# Altium PCB Piezo_Regulator_Head.PcbDoc (part 4 of 4)
Units mil, origin at the board's own origin, x right, y up, seen from the top; angles counter-clockwise.
Board outline 2047.24 x 1850.39 mil, 6 copper layers (Top Layer, GROUND, SIGNAL1, SIGNAL2, POWER, Bottom Layer), stack 60.866 mil thick; 136 components, 91 nets, 517 pads, 213 vias.
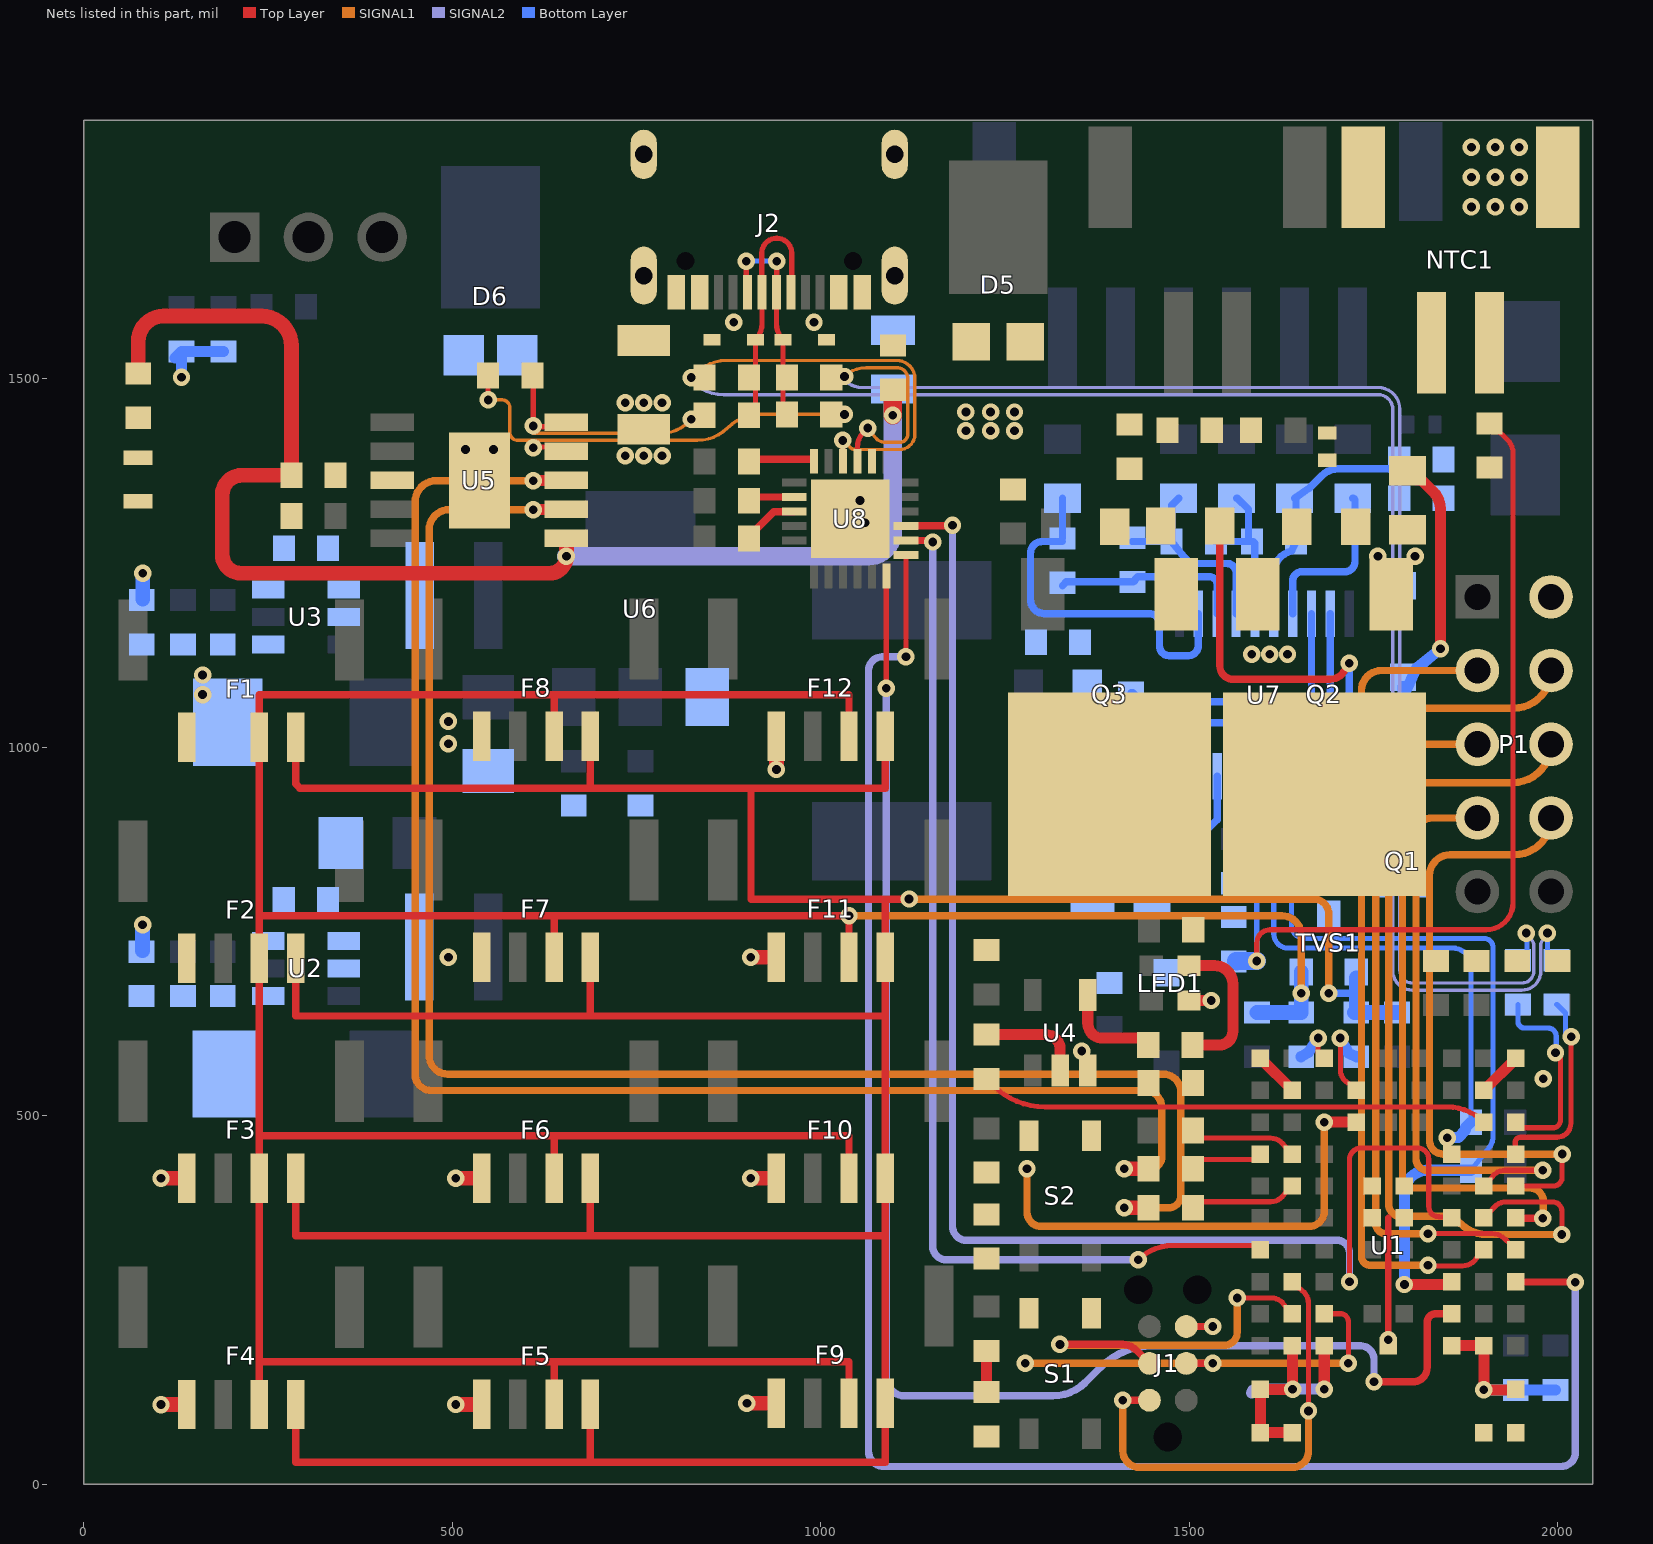
[diagram p6: the nets of this part, all layers, seen from the top]

## Via types
v1: diameter 23.62, hole 11.81, Top Layer to Bottom Layer, tented both sides, 213 vias

## Nets (pads, with @x,y where several pads share a name; then routed paths per layer and width w, separated by ;. In a path a pad name is that pad's centre, name@x,y a point inside that pad or via, vN(x,y) a via of type N, cw(c..) or ccw(c..) an arc to the next point about the centre after c; other vN are vias at no path point) (continued)
CFG2: R16.1 U5.2 | length 2223.3
  Top Layer w15: v1@610.12,1322.63 U5.2@655.11,1322.63
  Top Layer w20: v1(1412,375) R16.1@1445,375
  SIGNAL1 w10: v1(610.12,1322.28) 495.98,1322.28 ccw(c495.98,1295.1) 468.8,1295.1 468.8,581.55 ccw(c493.91,581.55) 493.91,556.45 1464.75,556.45 cw(c1464.75,532.49) 1488.71,532.49 1488.71,391.72 cw(c1471.99,391.72) 1471.99,375 v1(1412,375)
CFG3: R17.1 U5.3 | length 2197.5
  Top Layer w10: v1(610.12,1361.65) v1@610.12,1362
  Top Layer w15: v1@610.12,1362 U5.3@655.11,1362
  Top Layer w20: v1(1412,427.95) R17.1@1445,427.95
  SIGNAL1 w10: v1(610.12,1361.65) 478.81,1361.65 ccw(c478.81,1332.59) 449.75,1332.59 449.75,556.34 ccw(c471.91,556.34) 471.91,534.18 1439.85,534.18 cw(c1439.85,511.26) 1462.77,511.26 1462.77,443.87 cw(c1446.85,443.87) 1446.85,427.95 v1(1412,427.95)
CH_D_N: R9.2 R27.2 U5.5 | length 346.6
  Top Layer w7: R9.2@608.85,1504.44 cw(c608.85,1503.17) 610.12,1503.17 v1(610.12,1435.87) ; v1@610.12,1434.87 649.24,1434.87 ccw(c649.24,1440.74) U5.5@655.11,1440.74
  SIGNAL1 w4.61: v1@610.12,1434.87 610.12,1425.86 783.05,1425.86 ccw(c783.05,1480.19) 821.47,1441.77 v1(824.56,1444.87)
CH_D_P: R9.1 R29.2 U5.4 | length 629.4
  Top Layer w7: v1(548.88,1471.16) R9.1@548.85,1504.44 ; v1@610.12,1407.24 649.24,1407.24 cw(c649.24,1401.37) U5.4@655.11,1401.37
  SIGNAL1 w4.61: v1(548.88,1471.16) 567.83,1471.16 cw(c567.83,1460.65) 578.34,1460.65 578.34,1426.96 ccw(c589.05,1426.96) 589.05,1416.25 v1@610.12,1416.25 ; v1@610.12,1407.24 v1@610.12,1416.25 ; v1(1032.41,1451.49) 917.86,1451.49 ccw(c917.86,1389.2) 873.82,1433.25 cw(c832.79,1474.28) 832.79,1416.25 v1@610.12,1416.25
  other v1: 610.12,1406.24
CHG: Q1.2 U7.2 | length 219.8
  Bottom Layer w7: U7.2@1691.57,960.76 1691.57,821.61 ccw(c1705.16,821.61) 1705.16,808.01 Q1.2@1764.41,808.01
CTS_DEBUG: U1.J7 U8.18 | length 2010.3
  Top Layer w7: v1(1089,1080) 1089.11,1080.11 1089.11,1232.14 U8.18@1089.21,1232.24
  Top Layer w10: v1(1750.74,138.93) 1803.39,138.93 ccw(c1803.39,158.55) 1823,158.55 1823,219.61 cw(c1834.81,219.61) 1834.81,231.42 U1.J7@1856.54,231.42
  SIGNAL2 w10: v1(1089,1080) 1089.21,1079.79 1089.21,144.75 ccw(c1114.09,144.75) 1114.09,119.88 1315.26,119.88 ccw(c1315.26,181.74) 1359,138 1379.43,158.43 cw(c1450.14,87.72) 1450.14,187.72 1732.55,187.72 cw(c1732.55,169.52) 1750.74,169.52 v1(1750.74,138.93)
D_N: D7.2 J2.A7 J2.B7 R26.1 R27.1 | length 357.9
  Top Layer w7: R27.1@902.56,1450.46 R27.1@911.62,1450.46 ; R27.1@911.62,1440.46 D7.2@911.62,1553 ccw(c890.49,1574.13) 920.37,1574.13 J2.A7@920.37,1617.38 920.12,1637.5 920.12,1670.32 cw(c940.36,1670.32) 940.36,1690.56 940.43,1690.56 cw(c940.43,1670.25) 960.74,1670.32 960.74,1637.5 J2.B7@960.74,1617.38
D_P: D8.2 J2.A6 J2.B6 R28.1 R29.1 | length 300.2
  Top Layer w7: v1@899.43,1659.14 v1(898.98,1659.5) 898.98,1637.5 J2.B6@900.68,1617.38 ; v1(940.43,1659.5) 940.43,1637.5 J2.A6@940.06,1617.38 940.06,1574.35 ccw(c970.25,1574.35) D8.2@948.9,1553 948.9,1451.49 R29.1@954.41,1451.49
  Bottom Layer w7: v1(898.98,1659.5) 899.04,1659.56 v1@940.43,1659.56
DEBUG_UART: C40.2 R36.1 S2.3 U1.C4 | length 649.1
  Top Layer w15: v1(1683.31,491.26) U1.C4@1726.61,491.26
  SIGNAL1 w10: v1(1280,427.95) 1280,369.09 ccw(c1299.24,369.09) 1299.24,349.84 1662.79,349.84 ccw(c1662.79,370.35) 1683.31,370.35 v1(1683.31,491.26)
DSG: R46.1 U7.1 | length 538.4
  Top Layer w10: R46.1@1541.64,1300.17 1541.64,1110.2 ccw(c1559.67,1110.2) 1559.67,1092.17 1691.49,1092.17 ccw(c1691.49,1113.7) 1709.56,1101.98 v1(1717.16,1113.7)
  Bottom Layer w10: U7.1@1717.16,960.76 v1(1717.16,1113.7)
GND: C1.1 C2.1 C5.2 C6.1 C9.1 C10.1 C11.1 C12.1 C13.1 C14.1 C15.1 C17.1 C18.2 C19.1 C20.1 C21.1 C22.1 C23.1 C25.1 C26.1 C30.2 C31.1 C34.1 C35.1 C40.1 D2.2 D7.1 D8.1 F1.1 F2.1 F3.1 F4.1 F5.1 F6.1 F7.1 F8.1 F9.1 F10.1 F11.1 F12.1 J1.5 J2.A1/B12 J2.B1/A12 J2.S1 J2.S2 J2.S3 J2.S4 LED1.3 NT1.2 NTC1.2 NTC1.MP1 NTC1.MP2 P1.2 Q1.1 R7.2 R8.2 R14.1 R24.2 R30.1 R42.1 S1.1 S2.1 TVS1.3 U1.A1 U1.A9 U1.B2 U1.B8 U1.E4 U1.E5 U1.F4 U1.F5 U1.K2 U1.K3 U1.K5 U1.K7 U1.K8 U1.L1 U1.L9 U1.M1 U1.M2 U1.M8 U1.M9 U2.1 U3.1 U4.3 U5.11 U6.1 U7.3 U8.2 U8.25 | length 1445.2
  Top Layer w9: v1(1769.92,195.98) 1769.92,361.34
  Top Layer w10: J1.5@1496,214 v1(1532.02,214) ; U1.K2@1640,188.11 U1.K2@1640.26,187.85 ; U1.K5@1769.92,188.11 U1.K5@1769.92,194.92
  Top Layer w15: LED1.3@1499.59,656.38 v1(1529.87,656.38) ; U1.L1@1596.69,129.06 U1.L1@1596.69,128.79 ; U1.A1@1596.69,577.87 U1.B2@1640,534.57 ; U1.M2@1640,70 U1.M1@1596.69,70 U1.L1@1596.69,128.79 ; U1.K2@1640.26,187.85 1640.13,187.72 1640.13,128.92 v1(1640.26,128.79) U1.L1@1596.69,128.79 ; v1(1683.31,129.06) U1.K3@1683.31,188.11 ; U1.K7@1856.54,188.11 U1.K8@1899.84,188.11 v1(1899.84,128.11) 1942.2,128.11 ccw(c1942.2,129.06) U1.L9@1943.15,129.06 ; U1.B8@1899.84,534.57 U1.A9@1943.15,577.87
  Top Layer w20: v1(105,108.11) F4.1@140,108.11 ; v1(105,415) F3.1@140,415 ; v1(505,108.19) 539.72,108.19 F5.1@540,108.46 ; v1(505,415) F6.1@540,415 ; v1(900,110) F9.1@940,110 ; v1(905,415) F10.1@940,415 ; v1(905,715) F11.1@940,715 ; v1(940,969.75) F12.1@940,1015
  SIGNAL2 w15: 1584.88,123.64 cw(c1590.3,123.64) 1590.3,129.06 v1(1683.31,129.06)
  Bottom Layer w10: R8.2@78.66,722.48 R8.2@80,723.82 ; R7.2@78.85,1199.48 R7.2@80.19,1200.82
  Bottom Layer w15: R14.1@124.05,1528.24 R14.1@132.81,1537 ; v1(132.81,1502) R14.1@132.81,1537 ; C11.1@189.81,1537 R14.1@132.81,1537 ; v1(1899.84,128.11) R30.1@1996.95,128.11
  Bottom Layer w20: R8.2@80,723.82 v1(80,759) ; R7.2@80.19,1200.82 v1(80.19,1236)
  other v1: 1980.55,550 1354.21,587.68 495,715 495,1004.59 495,1035 161.39,1071.38 161.39,1097.94 1060.5,1304.33 1053.35,1334.84 518,1404 556,1404 882.21,1576.63 990.95,1576.63 1882.96,1733.04 1915.37,1733.04 1947.78,1733.04 1882.96,1773.45 1915.37,1773.45 1947.78,1773.45 1882.96,1813.86 1915.37,1813.86 1947.78,1813.86
LED_DO: R22.1 U1.C8 | length 691.8
  Top Layer w7: R22.1@1225,550 1233.71,541.29 ccw(c1304.42,612) 1304.42,512 1530.13,512 1538.5,512 1849.81,512 cw(c1849.77,441.19) U1.C8@1899.84,491.26
NetC3_1: C3.1 U3.6
NetC3_2: C3.2 L2.1 U3.2
NetC4_1: C4.1 U2.6
NetC4_2: C4.2 L1.1 U2.2
NetC7_1: C7.1 R4.1 R8.1 U2.4
NetC8_1: C8.1 R6.1 R7.1 U3.4
NetC15_2: C15.2 U7.8 | length 98.4
  Bottom Layer w10: C15.2@1510.02,875.41 1512.52,875.41 1522.52,885.41 1522.52,886.31 1538.02,901.81 U7.8@1538.02,960.76
NetC36_1: C36.1 C37.2
NetC38_1: C38.1 C39.2
NetD2_1: D2.1 R10.1
NetD3_2: D3.2 R33.1 R34.1
NetD4_1: D4.1 R44.1 R45.2 | length 372
  Top Layer w15: R45.2@1796.36,1375.02 1808.86,1362.52 1815.27,1362.52 1831.37,1346.42 cw(c1808.59,1323.64) 1840.81,1323.64 1840.81,1133.72 v1(1841,1133.53)
  Bottom Layer w15: 1790,1058.41 1790,1067.68 ; D4.1@1790,1082.53 1790,1067.68 ; v1(1841,1133.53) 1807.5,1106.2 1790,1067.68
NetD4_2: D4.2 Q2.1 R45.1 R48.2
  other v1: 1756.06,1259.2 1806.47,1259.2
NetD6_1: D6.1 D6.2 F13.2
  other v1: 735,1395.32 759.94,1395.32 784.87,1395.32 735,1467.32 759.94,1467.32 784.87,1467.32
NetF13_1: F13.1 J2.A4/B9 J2.B4/A9 R23.1
NetLED1_4: LED1.4 R20.2 R21.2 | length 203.5
  Top Layer w15: LED1.4@1499.59,703.62 1534.62,703.62 cw(c1534.62,678.99) 1559.24,678.99 1559.24,614.45 cw(c1540.8,614.45) 1540.8,596 R21.2@1504.48,596
NetQ1_3: Q1.3 R44.2
NetQ2_2: Q2.2 Q3.2
NetQ3_1: Q3.1 R46.2 R49.2
NetR5_2: R5.2 U1.D2 | length 147.7
  Top Layer w7: R5.2@1505,480.07 1515.49,469.58 1610.39,469.58 cw(c1610.39,447.95) 1626.91,461.92 1631.69,456.26 U1.D2@1640,447.95
NetR11_1: R11.1 U1.A3 | length 64.6
  Top Layer w7: v1@1675,604.35 1675,586.18 U1.A3@1683.31,577.87
  Bottom Layer w15: R11.1@1652,580 1662,585.94 v1@1674.55,605.26
  other v1: 1675,605.35
NetR12_1: R12.1 U1.B4 | length 114.2
  Top Layer w7: v1(1705.06,605.35) 1705.1,562.74 ccw(c1726.65,562.74) 1718.3,542.88 U1.B4@1726.61,534.57
  Bottom Layer w15: v1@1704.92,604.85 1715.54,585.84 1716.8,584.58 R12.1@1726.8,580
NetR16_2: R16.2 U1.E2 | length 140.8
  Top Layer w7: R16.2@1508.31,380.9 1510.62,383.2 1610.45,383.2 ccw(c1610.45,404.65) 1626.56,390.49 1631.69,396.33 U1.E2@1640,404.65
NetR17_2: R17.2 U1.D1 | length 100.7
  Top Layer w7: R17.2@1505,427.95 1505,429.27 1516.5,440.77 1589.51,440.77 U1.D1@1596.69,447.95
NetR20_1: R20.1 R21.1 U4.4 | length 136.8
  Top Layer w15: U4.4@1362.4,663.91 1362.4,625.74 ccw(c1382.93,625.74) 1382.93,605.21 1436.98,605.21 1444.48,597.71 R21.1@1444.48,596
NetR22_2: R22.2 U4.2 | length 140
  Top Layer w15: R22.2@1225,610 1305.21,610 cw(c1305.21,590.21) 1325,590.21 U4.2@1325,561.55
NetR25_1: R25.1 U5.8
NetR53_2: R53.2 U8.8 | length 64.6
  Top Layer w10: R53.2@902.56,1334.44 cw(c907.65,1334.44) 907.65,1339.53 U8.8@964.21,1339.53
NetR54_2: R54.2 U8.9 | length 78.3
  Top Layer w10: R54.2@902.56,1283.26 902.56,1285.76 936.13,1319.33 963.7,1319.33 U8.9@964.21,1319.84
NetR55_2: R55.2 U8.6 | length 90.5
  Top Layer w10: R55.2@902.56,1387.76 R55.2@904.46,1389.65 ; R55.2@904.46,1390.65 U8.6@990.28,1390.65 ; U8.6@990.28,1389.65 U8.6@990.79,1387.76
NetR57_1: R57.1 U1.D9 | length 278.1
  Top Layer w7: U1.D9@1943.15,447.95 cw(c1943.15,448.67) 1942.43,448.67 1942.43,463.82 cw(c1949.31,463.82) 1949.31,470.7 1999.02,470.7 ccw(c1999.02,489.5) 2017.83,489.5 v1@2017.83,605.69
  Bottom Layer w7: R57.1@1998.53,651 1999.25,651 2010.75,639.5 v1@2010.75,605.39 ; v1@2017.52,606 v1@2017.52,610.5
  other v1: 2018.52,607
NetR58_1: R58.1 U1.C9 | length 272.3
  Top Layer w7: U1.C9@1943.15,491.26 1951.46,483.58 1993.33,483.58 ccw(c1993.33,494.05) 2003.8,494.05 2003.8,580.66 v1@1997.99,586.47
  Bottom Layer w7: R58.1@1946,651 1946,628.06 ccw(c1955.17,628.06) 1955.17,618.89 1987.06,618.89 cw(c1987.06,607.97) 1997.99,607.97 v1@1997.99,586.47
  other v1: 1996.99,585.47
P0.05: P1.7 U1.E8 | length 806.7
  Top Layer w7: U1.E8@1899.84,404.65 1908.15,412.96 1911.59,417.51 cw(c1928.63,404.65) 1928.63,426 v1(1979.86,426) v1@1980.55,426
  SIGNAL1 w10: P1.7@1891,904 1829.12,904 ccw(c1829.12,882.69) 1807.81,882.69 1807.81,441.08 ccw(c1822.89,441.08) 1822.89,426 v1(1979.86,426)
P1.05: P1.8 U1.E9 | length 860.6
  Top Layer w7: U1.E9@1943.15,404.65 1994.23,404.65 ccw(c1994.23,416.41) 2006,416.41 v1(2006,447.95)
  SIGNAL1 w10: P1.8@1991,904 cw(c1941,904) 1941,854 1854.01,854 ccw(c1854.01,826.11) 1826.12,826.11 1826.12,466.38 ccw(c1844.55,466.38) 1844.55,447.95 v1(2006,447.95)
P1.12: P1.3 U1.G8 | length 1123.9
  Top Layer w7: v1@1823,298 1824.74,296.26 1870.89,296.26 ccw(c1870.89,318.83) 1891.53,309.72 U1.G8@1899.84,318.03
  SIGNAL1 w10: v1(1824,297) 1746.14,297 cw(c1746.14,309.4) 1733.74,309.4 1733.74,1076.74 cw(c1761,1076.74) 1761,1104 P1.3@1891,1104
P1.13: P1.4 U1.G9 | length 1165.8
  Top Layer w7: v1(1824,340) 1910.92,340 1910.99,340 cw(c1910.97,315.35) 1928.37,332.81 1934.84,326.34 U1.G9@1943.15,318.03
  SIGNAL1 w10: v1(1824,340) 1767.07,340 cw(c1767.07,354.17) 1752.9,354.17 1752.9,1037.69 cw(c1768.02,1037.69) 1768.02,1052.8 1939.8,1052.8 ccw(c1939.8,1104) P1.4@1991,1104
P1.14: P1.5 U1.F8 | length 1140.4
  Top Layer w7: U1.F8@1899.84,361.34 1908.15,369.65 1914.32,376.19 cw(c1930.09,361.34) 1930.09,383 1993.09,383 cw(c1993.09,370.43) 2005.65,370.43 v1(2005.65,338.9)
  SIGNAL1 w10: P1.5@1891,1004 1788.39,1004 ccw(c1788.39,986.45) 1770.84,986.45 1770.84,379.26 ccw(c1786.63,379.26) 1786.63,363.47 1844.52,363.47 cw(c1844.52,329.77) 1868.35,353.6 ccw(c1903.86,389.11) 1903.86,338.9 v1(2005.65,338.9)
P1.15: P1.6 U1.F9 | length 1028.7
  Top Layer w10: U1.F9@1943.64,360.85 v1(1979.86,360.85)
  SIGNAL1 w10: v1(1979.86,360.85) 1980.55,360.85 1980.55,383.71 ccw(c1962.27,383.71) 1962.27,401.99 1803.39,401.99 cw(c1803.39,415.87) 1789.51,415.87 1789.51,933.8 cw(c1807.7,933.8) 1807.7,952 1939,952 ccw(c1939,1004) P1.6@1991,1004
PACK_N: C36.2 C38.2 D5.1 D5.2 NT1.1 Q2.3 R48.1
  other v1: 1585,1126.13 1609.21,1126.13 1633.42,1126.13 1197.14,1429.41 1230.55,1429.41 1262.96,1429.41 1197.14,1454.82 1230.55,1454.82 1262.96,1454.82
R\E\S\E\T\: C2.2 J1.3 R3.1 S1.3 U1.J3 | length 625.8
  Top Layer w7: U1.J3@1683.31,231.42 1705,231.42 cw(c1705,220.42) 1716,220.42 v1(1716,164)
  Top Layer w10: J1.3@1496,164 v1(1532.02,164)
  Top Layer w15: C2.2@1225,125 R3.1@1225,181.02
  SIGNAL1 w10: v1(1277.68,164) v1(1532.02,164) v1(1716,164)
RTS_DEBUG: U1.H9 U8.19 | length 2552.3
  Top Layer w7: v1(1115.73,1122.69) 1115.73,1260.73 U8.19@1115.79,1260.79
  Top Layer w10: U1.H9@1943.15,274.72 1943.51,274.36 2023.64,274.36 v1(2024,274)
  SIGNAL2 w10: v1(1115.73,1122.69) 1083.69,1122.69 ccw(c1083.69,1104) 1065,1104 1065,45.02 ccw(c1086.02,45.02) 1086.02,24 2004.57,24 ccw(c2004.57,43.43) 2024,43.43 v1(2024,274)
RX_DEBUG: U1.F7 U8.21 | length 2008
  Top Layer w7: v1(1717.52,274.74) 1717.52,440.04 cw(c1733.74,440.04) 1733.74,456.26 1809.96,456.26 cw(c1809.96,441.19) 1825.04,441.19 1825.04,376.88 ccw(c1839.03,376.88) 1839.03,362.89 ; 1839.03,362.69 1855.18,362.69 U1.F7@1856.54,361.34
  Top Layer w10: U8.21@1115.89,1300.26 1178,1300.26 v1(1178.9,1301.16)
  SIGNAL2 w10: v1(1178.9,1301.16) 1178.9,349.82 ccw(c1197.72,349.82) 1197.72,331 1700.39,331 cw(c1700.39,313.88) 1717.52,313.88 v1(1717.52,274.74)
SCL: R31.1 U1.D7 U7.5 | length 759.1
  Top Layer w10: v1@1856.13,468.97 v1@1856.33,468.77 ; U1.D7@1856.33,448.16 U1.D7@1856.54,447.95
  Bottom Layer w7: U7.5@1614.8,960.76 1614.8,746.85 ccw(c1634.14,746.85) 1634.14,727.5 1857.59,727.5 cw(c1857.59,702.48) 1882.6,702.48 R31.1@1882.6,491.49
  Bottom Layer w15: v1@1854.11,468.97 1854.11,470.62 1865.17,470.62 1874.87,480.32 1874.87,483.76 R31.1@1882.37,491.26
  other v1: 1850.13,469.97
SDA: R32.1 U1.H7 U7.4 | length 1079.3
  Top Layer w15: v1(1792.08,271.04) 1852.85,271.04 U1.H7@1856.54,274.72
  Bottom Layer w7: U7.4@1638.94,932.92 1638.94,758.28 ccw(c1656.74,758.28) 1656.74,740.48 1900.22,740.48 cw(c1900.22,728.34) 1912.36,728.34 1912.36,472.99 cw(c1884.4,472.99) 1904.9,453.98 1903.78,452.77 R32.1@1882.37,426 ; U7.4@1640.39,960.76 U7.4@1643.19,957.96
  Bottom Layer w15: v1(1792.08,271.04) 1792.08,395.19 cw(c1822.89,395.19) 1822.89,426 R32.1@1882.37,426
SRN: C28.1 C31.2 R38.2 U7.19 | length 596.6
  Bottom Layer w10: C31.2@1352,950 1354.6,952.6 1354.6,1006.86 R38.2@1362,1014.27 C28.1@1421,1014.27 ; 1387.75,985.88 1398.93,987.28 1401.79,990.15 1420.71,1014.49 1420.71,1020.35 1433.5,1033.14 1675.15,1033.14 ccw(c1675.15,1049.56) 1691.57,1049.56 U7.19@1691.57,1181.24
SRP: C28.2 C30.1 R37.2 U7.18 | length 363
  Bottom Layer w10: C28.2@1421,1074.27 1423.5,1074.27 1436.31,1061.46 1649.63,1061.46 ccw(c1649.63,1077.8) 1665.98,1077.8 U7.18@1665.98,1181.24
SWCLK: J1.4 U1.J2 | length 512
  Top Layer w7: v1(1565.2,252.8) 1611.36,252.8 cw(c1611.36,231.42) 1628.77,243.82 1631.69,239.73 U1.J2@1640,231.42
  Top Layer w10: v1(1324.64,189.69) 1409.76,189.69 cw(c1409.76,164) 1427.97,182.12 J1.4@1446,164
  SIGNAL1 w10: v1(1324.64,189.69) 1325.79,188.53 1547.71,188.53 ccw(c1547.71,206.02) 1565.2,206.02 v1(1565.2,252.8)
SWDIO: J1.2 U1.H2 | length 620.4
  Top Layer w7: U1.H2@1640,274.72 1648.31,266.41 1652.92,263.05 cw(c1640,245.33) 1661.93,245.33 v1(1661.93,99.5)
  Top Layer w10: v1(1409.98,114) J1.2@1446,114
  SIGNAL1 w10: v1(1409.98,114) 1409.98,45.55 ccw(c1432.53,45.55) 1432.53,23 1640.26,23 ccw(c1640.26,44.66) 1651.59,26.2 ccw(c1640.26,44.66) 1658.73,33.34 ccw(c1640.26,44.66) 1661.93,44.66 v1(1661.93,99.5)
TS1: C25.2 NTC1.1 R42.2 U7.6 | length 1346.6
  Top Layer w7: v1(1591.59,709.91) 1591.59,734.04 cw(c1609.81,734.04) 1609.81,752.26 1902.6,752.26 ccw(c1902.6,789.13) 1939.47,789.13 1939.47,1398.77 ccw(c1913.37,1398.77) 1931.83,1417.23 1926.94,1422.11 1920.5,1427.76 C25.2@1907.37,1439.26
  Bottom Layer w7: U7.6@1589.2,960.76 1591.61,958.35 v1(1591.59,709.91)
  Bottom Layer w25: R42.2@1563.61,709.43 1564.1,709.91 v1(1591.59,709.91)
TWI0.SCL: F1.4 F2.4 F3.4 F4.4 F5.4 F6.4 F7.4 F8.4 F9.4 F10.4 F11.4 F12.4 R1.1 R12.2 TVS1.1 | length 5834
  Top Layer w10: F4.4@287.64,108.11 287.64,30 687.64,30 ; F3.4@287.64,415 287.64,336.89 687.64,336.89 ; F2.4@287.64,713.46 287.64,635.35 687.64,635.35 ; F1.4@287.64,1013.46 287.64,950.21 293.5,944.35 687.64,944.35 ; F5.4@687.64,108.46 687.64,30 ; F6.4@687.64,415 687.64,336.89 ; F7.4@687.64,713.82 687.64,635.35 ; F8.4@687.64,1013.82 687.64,944.35 ; F12.4@1087.64,1015 1087.64,944.35 905.53,944.35 ; v1(1120,794) 1119.59,793.59 1087.64,793.59 ; 687.64,30 1087.64,30 F9.4@1087.64,110 1087.64,336.89 ; 687.64,336.89 1087.64,336.89 ; 687.64,635.35 1087.64,635.35 ; 687.64,944.35 905.53,944.35 ; 905.53,944.35 905.53,793.59 1087.64,793.59 ; 1087.64,336.89 F10.4@1087.64,415 1087.64,635.35 ; 1087.64,635.35 F11.4@1087.64,715 1087.64,793.59
  SIGNAL1 w10: v1(1120,794) 1120.15,793.85 1668.93,793.85 cw(c1668.93,773.38) 1689.4,773.38 v1(1689.4,666.35)
  Bottom Layer w10: v1(1689.4,666.35) 1726.67,666.36
  Bottom Layer w20: R12.2@1724.3,640 R12.2@1726.8,640 R1.1@1782,640 ; R12.2@1726.67,640.14 1726.67,666.36 TVS1.1@1726.67,686.89
TWI0.SDA: F1.3 F2.3 F3.3 F4.3 F5.3 F6.3 F7.3 F8.3 F9.3 F10.3 F11.3 F12.3 R2.1 R11.2 TVS1.2 | length 5439.9
  Top Layer w10: F4.3@238.43,108.11 238.43,166.02 ; 238.43,472.91 638.43,472.91 ; 238.43,771.38 638.43,771.38 ; F5.3@638.43,108.46 638.43,166.02 ; F6.3@638.43,415.35 638.43,472.91 ; F7.3@638.43,713.82 638.43,771.38 ; F8.3@638.43,1013.82 638.43,1071.38 ; F9.3@1038.43,110 1038.43,166.02 638.43,166.02 ; F10.3@1038.43,416.89 1038.43,472.91 638.43,472.91 ; F11.3@1038.43,715.35 v1(1038.43,771.38) 638.43,771.38 ; F12.3@1038.43,1015.35 1038.43,1071.38 638.43,1071.38 ; 238.43,166.02 F3.3@238.43,415 F2.3@238.43,713.46 238.43,1071.38 638.43,1071.38 ; 238.43,166.02 638.43,166.02
  SIGNAL1 w10: v1(1038.43,771.38) 1625.56,771.38 cw(c1625.56,744.93) 1652,744.93 v1(1652,666.35)
  Bottom Layer w20: R2.1@1592,640 R11.2@1652,640 v1(1652,666.35) TVS1.2@1652,695
TX_DEBUG: U1.G1 U8.20 | length 1455.9
  Top Layer w7: v1(1431,304.55) cw(c1478.03,257.52) 1440.53,312.45 cw(c1478.03,257.52) 1478.03,324.03 1590.69,324.03 U1.G1@1596.69,318.03
  Top Layer w10: U8.20@1115.84,1280.42 1150.92,1280.42 v1@1151.96,1279.38
  SIGNAL2 w10: v1@1151.96,1279.38 1151.96,323.07 ccw(c1170.47,323.07) 1170.47,304.55 v1(1431,304.55)
  other v1: 1151.96,1278.38
USB_D_N: R26.2 R57.2 U8.4 | length 2614.2
  Top Layer w7: v1(824.56,1501.48) R26.2@842.56,1501.48 ; U8.4@1030.16,1387.76 v1(1030.16,1416.23)
  SIGNAL1 w4.61: v1(824.56,1501.48) 830.12,1507.03 cw(c872.56,1464.59) 872.56,1524.61 1103.33,1524.61 cw(c1103.33,1500.13) 1127.82,1500.13 1127.82,1427.37 1127.82,1424.49 cw(c1107.14,1424.56) 1107.2,1403.89 1104.33,1403.89 1047.81,1403.89 cw(c1047.81,1416.23) 1039.19,1407.4 v1(1030.16,1416.23)
  SIGNAL2 w4.61: v1@824.56,1496.48 ccw(c868.25,1540.16) 868.25,1478.38 1064,1478.38 1699.96,1478.38 1756.12,1478.38 1756.25,1478.38 cw(c1756.21,1458.32) 1776.27,1458.36 1776.27,1458.22 1776.27,696.59 ccw(c1802.47,696.59) 1802.47,670.39 1951.46,670.39 ccw(c1951.46,696) 1977.07,696 1977.07,731.81 cw(c1986.08,731.81) v1@1986.08,740.81
  Bottom Layer w7: v1(1986.08,747.81) 1986.08,723.46 ccw(c1998.53,723.46) R57.2@1998.53,711
USB_D_P: R28.2 R58.2 U8.3 | length 2139.1
  Top Layer w7: R28.2@1014.43,1501.48 1015.91,1502.96 v1(1032.43,1502.96) ; U8.3@1049.84,1387.76 1049.84,1400.99 1049.84,1406.43 cw(c1081.08,1406.38) 1060.51,1429.89 v1(1064.02,1432.96)
  SIGNAL1 w4.61: v1(1032.43,1502.96) cw(c1061.49,1473.89) 1061.49,1515 1103.33,1515 cw(c1103.33,1500.13) 1118.2,1500.13 1118.2,1427.37 1118.2,1424.51 cw(c1107.14,1424.56) 1107.18,1413.5 1104.38,1413.5 ; v1(1064.02,1432.96) 1073.38,1420.98 ccw(c1088.72,1432.96) 1088.72,1413.5 1104.33,1413.5
  SIGNAL2 w4.61: v1@1032.43,1497.96 ccw(c1056.48,1522.02) 1056.48,1487.99 1087.96,1487.99 1699.96,1487.99 1756.12,1487.99 cw(c1756.12,1478.38) 1756.18,1487.99 cw(c1756.21,1458.32) 1785.88,1458.42 1785.89,1458.28 cw(c1776.27,1458.22) 1785.89,1458.22 1785.89,696.59 ccw(c1802.47,696.59) 1802.47,680 1951.46,680 ccw(c1951.46,696) 1967.46,696 1967.46,731.81 ccw(c1958.46,731.81) v1@1958.46,740.81
  Bottom Layer w7: R58.2@1946,711 ccw(c1946,723.46) 1958.46,723.46 v1@1958.46,747.81
  other v1: 1957.46,747.81
VC0: C35.2 R47.2 U7.17 | length 231.6
  Bottom Layer w10: U7.17@1640.39,1181.24 1640.39,1225.55 cw(c1652.84,1225.55) 1652.84,1238 1711.09,1238 ccw(c1711.09,1251.91) 1725,1251.91 1725,1334.64 ccw(c1721.85,1334.64) R47.2@1721.85,1337.79
VC1: C33.1 C34.2 R43.2 U7.16 | length 323
  Bottom Layer w10: U7.16@1614.8,1181.24 1614.8,1236.4 cw(c1645,1236.4) 1633.56,1264.35 1639.06,1266.6 1639.2,1266.67 C33.1@1645,1279.17 1645,1335.9 R43.2@1643.11,1337.79 1663.11,1351.51 1680.04,1368.44 cw(c1702.36,1346.12) 1702.36,1377.69 C34.2@1782.18,1377.69
VC2: C32.1 C33.2 R41.2 U7.15 | length 215.1
  Bottom Layer w10: C32.1@1536.14,1279.17 C33.2@1580.46,1279.17 ; R41.2@1564.37,1337.76 1565.46,1337.76 1580.46,1322.76 C33.2@1580.46,1279.17 ; U7.15@1589.2,1181.24 1589.2,1274.96 ccw(c1585,1274.96) C33.2@1585,1279.17 C33.2@1580.46,1279.17
VC3: C32.2 R39.2 R56.1 U7.14 | length 278.7
  Bottom Layer w10: R56.1@1423,1279.17 C32.2@1476.14,1279.17 ; R39.2@1485.63,1337.73 1476.14,1328.24 C32.2@1476.14,1279.17 ; 1510.9,1249.28 cw(c1510.9,1272.09) 1492.98,1257.98 1486.14,1266.67 C32.2@1476.14,1279.17 ; 1510.95,1249.28 1551.16,1249.28 cw(c1551.16,1236.82) 1563.61,1236.82 U7.14@1563.61,1181.24
VC4: C27.1 R56.2 U7.13 | length 261.1
  Bottom Layer w10: C27.1@1328.15,1219.17 1333.39,1224.41 1423.24,1224.41 ccw(c1423.24,1227.83) 1426.66,1227.83 1430.33,1231.49 1527.13,1231.49 cw(c1527.13,1220.6) 1538.02,1220.6 U7.13@1538.02,1181.24
VC5: C27.2 R35.2 U7.12 | length 505.1
  Bottom Layer w10: C27.2@1328.15,1279.17 1301.06,1279.17 ccw(c1301.06,1262.74) 1284.63,1262.74 1284.63,1200.25 ccw(c1303.65,1200.25) 1303.65,1181.24 1445.99,1181.24 cw(c1445.99,1167.43) 1459.8,1167.43 1459.8,1137.39 ccw(c1472.96,1137.39) 1472.96,1124.24 1498.67,1124.24 ccw(c1498.67,1138) 1512.43,1138 U7.12@1512.43,1181.24 ; C27.2@1328.15,1283.17 R35.2@1328.15,1337.7
VDD_20V: C19.2 R10.2 R23.2 R25.2 U5.1 | length 1868.3
  Top Layer w20: R10.2@74,1507 74,1550.07 cw(c108.93,1550.07) 108.93,1585 241.33,1585 cw(c241.33,1544.36) 281.97,1544.36 R25.2@281.97,1369 215,1369 ccw(c215,1342) 188,1342 188,1261.82 ccw(c213.82,1261.82) 213.82,1236 632.15,1236 ccw(c632.15,1258.96) v1(655.11,1258.96) U5.1@655.11,1283.26
  Top Layer w25: v1(1098,1450.46) R23.2@1098,1485
  SIGNAL2 w25: v1(655.11,1258.96) 1064.26,1258.96 ccw(c1064.26,1292.7) 1098,1292.7 v1(1098,1450.46)
  Bottom Layer w25: v1(1098,1450.46) C19.2@1098,1486
pads on no net: F1.5 F1.6 F2.5 F2.6 F3.5 F3.6 F4.5 F4.6 F5.5 F5.6 F6.5 F6.6 F7.5 F7.6 F8.5 F8.6 F9.5 F9.6 F10.5 F10.6 F11.5 F11.6 F12.5 F12.6 J1. J1.6 J2.A8 J2.B8 J2.MH J4.2 J4.MP1 J4.MP2 LED1.2 S1.2 S1.4 S2.2 S2.4 SW1.1 U1.A2 U1.A4 U1.A5 U1.A6 U1.B1 U1.B3 U1.B5 U1.B6 U1.B9 U1.C1 U1.C2 U1.C5 U1.C6 U1.D3 U1.D8 U1.E1 U1.E3 U1.E7 U1.F1 U1.F2 U1.F3 U1.G3 U1.G4 U1.G5 U1.G7 U1.H1 U1.H3 U1.H8 U1.J1 U1.J4 U1.J5 U1.J8 U1.K1 U1.K9 U2.5 U3.5 U4.1 U5.10 U7.11 U8.1 U8.10 U8.11 U8.12 U8.13 U8.14 U8.15 U8.16 U8.17 U8.22 U8.23 U8.24

## Polygon pours and split planes (outlines as drawn)
GND on GROUND "NONET_L-01_P-001" (solid, pour order 0): 0,0 0,1850.39 2047.24,1850.39 2047.24,0
GND on Bottom Layer "NONET_L-01_P-001" (solid, remove dead copper, pour order 20): 0,0 0,1850.39 2047.24,1850.39 2047.24,0
3V3 on Bottom Layer "NONET_L-01_P-001" (solid, pour order 15): 1609.5,595 1609.5,555.46 1764.5,555.46 1764.5,610.94 1882.6,610.94 1882.6,500.51 1523,500.51 1523,595
20V on Bottom Layer "NONET_L-01_P-001" (solid, pour order 14): 105,1114.48 134.85,1114.48 134.85,965 254.73,965 254.73,1118.88 475.12,1118.88 475.12,915.2 309,915.2 309,845 0,845 0,1850.39 350,1850.39 350,1580.01 105,1580.01 105,1174.48
BATT_P on Bottom Layer "NONET_L-01_P-001" (solid, pour order 11): 1486.94,640.16 1486.94,497.83 263.2,497.83 263.2,640.16
BATT_P on Bottom Layer "NONET_L-01_P-001" (solid, pour order 8): 1138,1595.54 1138,1397.7 1284,1397.7 1284,1704.26 1196.1,1704.26 1196.1,1788.46 361,1788.46 361,1595.54
BATT_P on Bottom Layer "NONET_L-01_P-001" (solid, pour order 6): 2037.37,1703.28 1843.9,1703.28 1843.9,1850.39 1660.69,1850.39 1284,1850.39 1284,1688 1259,1688 1259,1397.7 1371.21,1397.7 1371.21,1639.07 1754.5,1639.07 1754.5,1472 2037.37,1472
BATT_N on Bottom Layer "NONET_L-01_P-001" (solid, pour order 3): 1302,1105.27 1232.05,1105.27 1232.05,1252.54 922,1252.54 922,1055.27 1302,1055.27
#DSG on Bottom Layer "NONET_L-01_P-001" (solid, pour order 2): 922,819.46 1232.05,819.46 1232.05,989.27 1302,989.27 1302,1039.27 922,1039.27
NetD6_1 on Bottom Layer "NONET_L-01_P-001" (solid, pour order 1): 448.42,1464.2 680.75,1464.2 680.75,1368.84 820.66,1368.84 820.66,1577.82 448.42,1577.82
12V on POWER "NONET_L-01_P-001" (solid, pour order 17): 117.12,1301.82 735,1301.82 735,677.91 1346.75,677.91 1346.75,821.13 905.53,821.13 905.53,1055.27 2047.24,1055.27 2047.24,740 1939.47,740 1939.47,847.05 1805.39,847.05 1805.39,562.68 650,562.68 650,884.4 170,884.4 170,1211.45 117.12,1211.45
3V3 on POWER "NONET_L-01_P-001" (solid, pour order 16): 1925,835 1925,726.16 2047.24,726.16 2047.24,0 353.68,0 353.68,627.88 170,627.88 170,870 635.61,870 635.61,550 1819.74,550 1819.74,835
PACK_N on POWER "NONET_L-01_P-001" (solid, pour order 13): 1174.14,1483.59 1686,1483.59 1686,1070 1174.14,1070
BATT_P on POWER "NONET_L-01_P-001" (solid, pour order 10): 155.85,1315 105,1315 105,1199.47 155.85,1199.47 155.85,614.18 280.31,614.18 281.35,614.18 340.79,614.18 340.79,0 0,0 0,1850.39 735,1850.39 735,1315
5V on POWER "NONET_L-01_P-001" (solid, pour order 7): 892.97,1268.67 892.97,810 1336,810 1336,691.2 749.37,691.2 749.37,1268.67
BATT_N on POWER "NONET_L-01_P-001" (solid, pour order 4): 910,1283.26 749.37,1283.26 749.37,1850.39 2047.24,1850.39 2047.24,1071.38 1710.81,1071.38 1710.81,1504.14 1151.96,1504.14 1151.96,1071.38 910,1071.38
BATT_N on Top Layer "NONET_L-01_P-001" (solid, pour order 24): 1449.04,1480.14 1449.04,1589 1355.79,1589 1355.79,1850.39 1686.42,1850.39 1686.42,1705.95 1530.63,1705.95 1530.63,1480.14
PACK_N on Top Layer "NONET_L-01_P-001" (solid, pour order 23): 1571.28,1324 1571.28,1392.76 1694.92,1392.76 1694.92,1113.7 1571.28,1113.7
GND on Top Layer "NONET_L-01_P-001" (solid, remove dead copper, pour order 21): 0,0 0,1850.39 2047.24,1850.39 2047.24,0
PACK_N on Top Layer "NONET_L-01_P-001" (solid, pour order 12): 1666,1324 1666,1113.7 1571.28,1113.7 1571.28,1324
NetF13_1 on Top Layer "NONET_L-01_P-001" (solid, pour order 9): 845.41,1571.12 845.41,1583.76 1014.41,1583.76 1014.41,1571.12 1029.41,1571.12 1029.41,1530.77 1164.39,1530.77 1164.39,1850.39 650,1850.39 650,1530.77 806.69,1530.77 806.69,1571.12
#DSG on Top Layer "NONET_L-01_P-001" (solid, pour order 5): 1132,793.59 1132,912 1241.71,912 1241.71,1082.76 1339,1082.76 1339,1324 1089.21,1324 1089.21,944.35 905.53,944.35 905.53,793.59
GND on SIGNAL2 "NONET_L-01_P-001" (solid, remove dead copper, pour order 22): 0,0 0,1850.39 2047.25,1850.39 2047.25,0
12V on SIGNAL2 "NONET_L-01_P-001" (solid, pour order 18): 0,0 1015.63,0 1015.63,1005 0,1005
GND on SIGNAL1 "NONET_L-01_P-001" (solid, remove dead copper, pour order 19): 0,0 0,1850.39 2047.24,1850.39 2047.24,0

## Other copper
Top Layer:
  rectangle net PACK_N: 1563.46,1113.7 1694.92,1257.01
  rectangle net GND: 1736.46,349.53 1803.39,373.15
  rectangle net PACK_N: 1449.04,1334.84 1687.11,1403.7
  rectangle net PACK_N: 1449.04,1334.84 1506.63,1452.76
  rectangle net BATT_P: 1609.39,1412.62 1659.11,1617.94
  rectangle net BATT_P: 1544.69,1478.38 1659.11,1695.35
  rectangle net NetC36_1: 1515.63,1412.62 1599.11,1447.62
  rectangle net PACK_N: 1626,1332.05 1758.89,1392.76
  rectangle net PACK_N: 1357.15,1407.76 1506.63,1452.76
  rectangle net PACK_N: 1174.17,1407.76 1436.5,1575.59
  rectangle net BATT_P: 1174.17,1589 1341.67,1842.35
  rectangle net NetQ2_2: 1254.28,798.35 1831.34,1073.94
  rectangle net NetD6_1: 719.26,1379.69 801.19,1483.98
  rectangle net USB_D_N: 1024.65,1371.02 1035.67,1416.23
  rectangle net PACK_N: 1572.72,1158.58 1666,1324
  rectangle net NetQ3_1: 1379,1158.58 1512.15,1325.17
  rectangle net #DSG: 1243.5,1158.58 1339,1324
  rectangle net NetC38_1: 1243.5,1334.84 1436.5,1392.76
  rectangle net BATT_P: 1174.17,1589 1341.67,1686.9
  rectangle net TS1: 1889.87,1424.26 1924.87,1549.04
  rectangle net NetD4_2: 1706,1158.58 1821.36,1324
  rectangle net SCL: 1841.6,436.14 1858.62,468.97
  rectangle net 5V: 1254.28,642.25 1325,769.76
  rectangle net 5V: 1392.07,689.84 1464.16,769.76
  rectangle net 5V: 1254.28,708.63 1464.16,769.76
  rectangle net 5V: 1207.51,642.25 1299.41,685.56
  rectangle net NetR20_1: 1429.48,526.71 1460,613.5
  rectangle net NetLED1_4: 1489.48,526.71 1520,613.5
  rectangle net DEBUG_UART: 1207.5,351.21 1295.47,437.24
  rectangle net DEBUG_UART: 1262.01,351.21 1295.47,493.58
  rectangle net R\E\S\E\T\: 1269.88,110 1295.47,252.36
  rectangle net R\E\S\E\T\: 1207.5,110 1295.47,196.02
  rectangle net CFG1: 326.97,1310.82 448.42,1334.44
  rectangle net NetR25_1: 326.97,1350.19 448.42,1373.81
  rectangle net NetD2_1: 56.5,1392.53 91.5,1462
  rectangle net 3V3: 1840,522.76 1870,630
  rectangle net 3V3: 1840,566.06 1912.36,665
  rectangle net 3V3: 1815,630 2020,665
  region net GND: 2037.05,1630 1848.31,1630 1848.31,1409.26 1674.61,1409.26 1674.61,1694.55 1696.42,1694.55 1706.58,1694.55 1706.58,1840.2 2037.05,1840.2
Bottom Layer:
  rectangle net VC0: 1696.85,1317.79 1800,1357.79
  rectangle net C0: 1715.08,1425.29 1805.5,1450.29
  rectangle net BATT_N: 1824.5,1425.29 2037.37,1450.29
  rectangle net 3V3: 1927.37,491.26 1996.99,524.23
  rectangle net 3V3: 1927.37,408.5 1957.37,508.76
  rectangle net 20V: 286.54,1580.01 322.62,1692
  rectangle net 3V3: 419,830 635.47,905
  rectangle net BATT_P: 286.48,497.83 474.93,615.94
  rectangle net BATT_N: 1893.76,1299.5 2037.37,1445.5
  rectangle net NetD4_2: 1741.54,1200.31 1825,1277.22
  rectangle net BAT.MEASURE: 115.31,1582 241.54,1612
  rectangle net NetQ1_3: 1765,871 1815,963.12
  rectangle net NetD4_1: 1765,1003.12 1815,1113.7
  rectangle net BATT_P: 1374.57,551.29 1486.94,635
  rectangle net NetD3_2: 1424.37,665 1486.94,815.41
  rectangle net NetD3_2: 1374.57,665 1486.94,712.71
  rectangle net #BATT_P: 1449.89,901.26 1518.73,992.26
  rectangle net #BATT_P: 1337,854.41 1484.23,920
  rectangle net C0: 1721.85,1431.27 1802.5,1445.5
  rectangle net SRP: 1337,1055.27 1438.5,1159.77
  rectangle net SRN: 1337,932.5 1438.5,1039.27
  rectangle net BATT_P: 1308.46,1417.7 1347.83,1554.81
  rectangle net C0: 1702.17,1417.73 1741.54,1554.81
  rectangle net C1: 1623.43,1417.73 1662.8,1554.81
  rectangle net C2: 1544.69,1417.73 1584.06,1554.81
  rectangle net C3: 1465.94,1417.73 1505.32,1554.81
  rectangle net 5V: 726.02,1133.05 875.63,1347.41
  rectangle net 12V: 595.75,954.23 694.53,1067.88
  rectangle net 5V: 726.02,965.96 785.08,1308.04
  rectangle net 12V: 514.13,1012.67 694.53,1237.02
  rectangle net NetC3_1: 228.44,1202.08 286.67,1287.38
  rectangle net NetC3_2: 316.67,1237.02 475.12,1287.38
  rectangle net NetC3_2: 330.8,1164.68 475.12,1189.08
  rectangle net NetC3_2: 399.19,1133.05 475.12,1287.38
  rectangle net 12V: 514.13,1037.88 584.13,1287.38
  rectangle net 20V: 330.8,974.83 384.65,1151.68
  rectangle net 20V: 331.67,974.83 475.12,1118.88
  rectangle net NetC8_1: 78.85,1127.27 272.54,1151.68
  rectangle net 12V: 514.13,1037.88 635.66,1290.53
  rectangle net 3V3: 513.94,656.05 635.47,860
  rectangle net NetC7_1: 78.66,650.27 272.35,674.68
  rectangle net BATT_P: 331.48,497.83 474.93,635.35
  rectangle net BATT_P: 330.61,497.83 384.47,674.68
  rectangle net 3V3: 513.94,656.05 583.94,810.38
  rectangle net NetC4_2: 399,656.05 474.93,801.71
  rectangle net NetC4_2: 330.61,687.68 474.93,712.08
  rectangle net NetC4_2: 316.48,760.02 474.93,801.71
  rectangle net NetC4_1: 228.25,725.08 286.48,810.38

## Silkscreen, mask and mechanical layers (free items; w line width, h text height)
Top Overlay:
  circle w10: c902.67,91.94 r5.58
  circle w10: c502.39,90.13 r5.58
  circle w10: c102.67,90.05 r5.58
  circle w10: c102.67,396.94 r5.58
  circle w10: c502.67,396.94 r5.58
  circle w10: c902.67,396.94 r5.58
  circle w10: c902.67,696.94 r5.58
  circle w10: c502.67,696.94 r5.58
  circle w10: c102.67,695.4 r5.58
  circle w10: c902.67,996.94 r5.58
  circle w10: c502.67,996.94 r5.58
  circle w10: c102.67,995.4 r5.58
  text "NTC" at 1718.14,1487.77 h40
  text "ON-OFF SWITCH" at 144.81,1484.03 h40
  text "+" at 1616.62,1481.77 h60
  text "BAT" at 1312.85,1476.66 h40
  text "-" at 1411.75,1477.32 h60
  text "PWR" at 154.43,1294 h40 r90
  text "+" at 1876.48,1268.76 h60
  text "CON-2" at 525,918.66 h40
  text "CON-3" at 925,918.66 h40
  text "CON-1" at 125,917.13 h40
  text "CON-5" at 525,618.66 h40
  text "CON-6" at 925,618.66 h40
  text "CON-4" at 125,617.13 h40
  text "CON-7" at 125,318.66 h40
  text "CON-8" at 525,318.66 h40
  text "CON-9" at 925,318.66 h40
  text "CON-12" at 925,13.66 h40
  text "CON-10" at 125,11.77 h40
  text "CON-11" at 525,12.13 h40
Bottom Overlay:
  text "CELL /  / 1 - 4" at 2011.22,1672.59 h40
  text "C4" at 1354.05,1443.65 h40
  text "C3" at 1511.16,1443.69 h40
  text "C2" at 1589.79,1443.71 h40
  text "C1" at 1668.53,1443.74 h40
  text "C0" at 1747.27,1443.74 h40
Dimension:
  drawing of 399 lines, arcs and shapes, not listed
  text "Layer" at 3012.34,2079.58 h60
  text "Name" at 3422.26,2079.58 h60
  text "Material" at 4352,2079.58 h60
  text "Thickness" at 5211.77,2079.58 h60
  text "Constant" at 5861.6,2079.58 h60
  text "Board Layer Stack" at 6431.46,2079.58 h60
  text "Top Overlay" at 3422.26,1959.58 h60
  text "Top Solder" at 3422.26,1839.58 h60
  text "Solder Resist" at 4352,1839.58 h60
  text "0.010mm" at 5211.77,1839.58 h60
  text "3.5" at 5861.6,1839.58 h60
  text "1" at 3012.34,1719.58 h60
  text "Top Layer" at 3422.26,1719.58 h60
  text "0.035mm" at 5211.77,1719.58 h60
  text "Dielectric 2" at 3422.26,1599.58 h60
  text "PP-006" at 4352,1599.58 h60
  text "0.099mm" at 5211.77,1599.58 h60
  text "4.4" at 5861.6,1599.58 h60
  text "2" at 3012.34,1479.58 h60
  text "GROUND" at 3422.26,1479.58 h60
  text "CF-004" at 4352,1479.58 h60
  text "0.015mm" at 5211.77,1479.58 h60
  text "Dielectric 4" at 3422.26,1359.58 h60
  text "PP-006" at 4352,1359.58 h60
  text "0.550mm" at 5211.77,1359.58 h60
  text "4.1" at 5861.6,1359.58 h60
  text "3" at 3012.34,1239.58 h60
  text "SIGNAL1" at 3422.26,1239.58 h60
  text "CF-004" at 4352,1239.58 h60
  text "0.015mm" at 5211.77,1239.58 h60
  text "Dielectric 1" at 3422.26,1119.58 h60
  text "FR-4" at 4352,1119.58 h60
  text "0.116mm" at 5211.77,1119.58 h60
  text "4.6" at 5861.6,1119.58 h60
  text "4" at 3012.34,999.58 h60
  text "SIGNAL2" at 3422.26,999.58 h60
  text "CF-004" at 4352,999.58 h60
  text "0.015mm" at 5211.77,999.58 h60
  text "Dielectric 5" at 3422.26,879.58 h60
  text "PP-006" at 4352,879.58 h60
  text "0.550mm" at 5211.77,879.58 h60
  text "4.1" at 5861.6,879.58 h60
  text "5" at 3012.34,759.58 h60
  text "POWER" at 3422.26,759.58 h60
  text "CF-004" at 4352,759.58 h60
  text "0.015mm" at 5211.77,759.58 h60
  text "Dielectric 3" at 3422.26,639.58 h60
  text "PP-006" at 4352,639.58 h60
  text "0.099mm" at 5211.77,639.58 h60
  text "4.4" at 5861.6,639.58 h60
  text "6" at 3012.34,519.58 h60
  text "Bottom Layer" at 3422.26,519.58 h60
  text "0.035mm" at 5211.77,519.58 h60
  text "Bottom Solder" at 3422.26,399.58 h60
  text "Solder Resist" at 4352,399.58 h60
  text "0.010mm" at 5211.77,399.58 h60
  text "3.5" at 5861.6,399.58 h60
  text "Bottom Overlay" at 3422.26,279.58 h60
  text "Total board thickness:" at 3012.34,159.58 h60
  text "1.566mm" at 5211.77,159.58 h60
Board Outline:
  the board outline again, w10
Drill Drawing:
  circle w10: c140.62,4102.27 r33.33
  lines w10: 107.29,3168.94 173.96,3168.94 173.96,3235.61 107.29,3235.61 107.29,3168.94 ; 107.29,3335.61 123.96,3335.61 123.96,3318.94 157.29,3318.94 157.29,3335.61 173.96,3335.61 173.96,3368.94 157.29,3368.94 157.29,3385.61 123.96,3385.61 123.96,3368.94 107.29,3368.94 107.29,3335.61 ; 107.29,3468.94 140.62,3485.61 173.96,3468.94 157.29,3502.27 173.96,3535.61 140.62,3518.94 107.29,3535.61 123.96,3502.27 107.29,3468.94 ; 107.29,3618.94 107.29,3635.61 123.96,3652.27 107.29,3668.94 107.29,3685.61 123.96,3685.61 140.62,3668.94 157.29,3685.61 173.96,3685.61 173.96,3668.94 157.29,3652.27 173.96,3635.61 173.96,3618.94 157.29,3618.94 140.62,3635.61 123.96,3618.94 107.29,3618.94 ; 107.29,3785.61 123.96,3785.61 140.62,3768.94 157.29,3785.61 173.96,3785.61 157.29,3802.27 173.96,3818.94 157.29,3818.94 140.62,3835.61 123.96,3818.94 107.29,3818.94 123.96,3802.27 107.29,3785.61 ; 107.29,3985.61 173.96,3985.61 140.62,3918.94 107.29,3985.61
  lines w15: 47.5,3123.94 11028.43,3123.94 ; 47.5,4173.94 11028.43,4173.94 ; 598.38,2973.94 598.38,4323.94 ; 1198.22,2973.94 1198.22,4323.94 ; 2297.9,2973.94 2297.9,4323.94 ; 2803.77,2973.94 2803.77,4323.94 ; 3537.57,2973.94 3537.57,4323.94 ; 5037.13,2973.94 5037.13,4323.94 ; 5626.97,2973.94 5626.97,4323.94 ; 6372.77,2973.94 6372.77,4323.94 ; 7462.45,2973.94 7462.45,4323.94 ; 8316.22,2973.94 8316.22,4323.94 ; 9649.83,2973.94 9649.83,4323.94 ; 47.5,2973.94 11028.43,2973.94 11028.43,4323.94 47.5,4323.94 47.5,2973.94
  text "Symbol" at 137.5,4218.94 h72
  text "Count" at 643.38,4218.94 h72
  text "Hole Size" at 1243.22,4218.94 h72
  text "Plated" at 2342.9,4218.94 h72
  text "Hole Type" at 2848.77,4218.94 h72
  text "Drill Layer Pair" at 3582.57,4218.94 h72
  text "Via/Pad" at 5082.13,4218.94 h72
  text "Pad Shape" at 5671.97,4218.94 h72
  text "Template" at 6417.77,4218.94 h72
  text "Description" at 7507.45,4218.94 h72
  text "Hole Tolerance (+)" at 8361.22,4218.94 h72
  text "Hole Tolerance (-)" at 9694.83,4218.94 h72
  text "2" at 643.38,4068.94 h60
  text "23.62mil (0.600mm)" at 1243.22,4068.94 h60
  text "PTH" at 2342.9,4068.94 h60
  text "Slot" at 2848.77,4068.94 h60
  text "Top Layer - Bottom Layer" at 3582.57,4068.94 h60
  text "Pad" at 5082.13,4068.94 h60
  text "Rounded" at 5671.97,4068.94 h60
  text "r90_170h60_140r45" at 6417.77,4068.94 h60
  text "2" at 643.38,3918.94 h60
  text "23.62mil (0.600mm)" at 1243.22,3918.94 h60
  text "PTH" at 2342.9,3918.94 h60
  text "Slot" at 2848.77,3918.94 h60
  text "Top Layer - Bottom Layer" at 3582.57,3918.94 h60
  text "Pad" at 5082.13,3918.94 h60
  text "Rounded" at 5671.97,3918.94 h60
  text "(Mixed)" at 6417.77,3918.94 h60
  text "2" at 643.38,3768.94 h60
  text "24.41mil (0.620mm)" at 1243.22,3768.94 h60
  text "NPTH" at 2342.9,3768.94 h60
  text "Round" at 2848.77,3768.94 h60
  text "Top Layer - Bottom Layer" at 3582.57,3768.94 h60
  text "Pad" at 5082.13,3768.94 h60
  text "Rounded" at 5671.97,3768.94 h60
  text "c0hn62" at 6417.77,3768.94 h60
  text "3" at 643.38,3618.94 h60
  text "39.00mil (0.991mm)" at 1243.22,3618.94 h60
  text "NPTH" at 2342.9,3618.94 h60
  text "Round" at 2848.77,3618.94 h60
  text "Top Layer - Bottom Layer" at 3582.57,3618.94 h60
  text "Pad" at 5082.13,3618.94 h60
  text "Rounded" at 5671.97,3618.94 h60
  text "c51hn99" at 6417.77,3618.94 h60
  text "3" at 643.38,3468.94 h60
  text "43.31mil (1.100mm)" at 1243.22,3468.94 h60
  text "PTH" at 2342.9,3468.94 h60
  text "Round" at 2848.77,3468.94 h60
  text "Top Layer - Bottom Layer" at 3582.57,3468.94 h60
  text "Pad" at 5082.13,3468.94 h60
  text "(Mixed)" at 5671.97,3468.94 h60
  text "(Mixed)" at 6417.77,3468.94 h60
  text "10" at 643.38,3318.94 h60
  text "35.43mil (0.900mm)" at 1243.22,3318.94 h60
  text "PTH" at 2342.9,3318.94 h60
  text "Round" at 2848.77,3318.94 h60
  text "Top Layer - Bottom Layer" at 3582.57,3318.94 h60
  text "Pad" at 5082.13,3318.94 h60
  text "(Mixed)" at 5671.97,3318.94 h60
  text "(Mixed)" at 6417.77,3318.94 h60
  text "213" at 643.38,3168.94 h60
  text "11.81mil (0.300mm)" at 1243.22,3168.94 h60
  text "PTH" at 2342.9,3168.94 h60
  text "Round" at 2848.77,3168.94 h60
  text "Top Layer - Bottom Layer" at 3582.57,3168.94 h60
  text "Via" at 5082.13,3168.94 h60
  text "Rounded" at 5671.97,3168.94 h60
  text "v60h30m0mx0" at 6417.77,3168.94 h60
  text "235 Total" at 643.38,3018.94 h60
  text "Slot definitions :" at 137.5,2873.97 h60
  text "Routed Path Length" at 1170.19,2873.97 h60
  text "= Calculated from tool start centre position to tool end centre position." at 2272.86,2873.97 h60
  text "Hole Length" at 1170.19,2773.99 h60
  text "= Routed Path Length + Tool Size = Slot length as defined in the PCB layout" at 1862.99,2773.99 h60

## Dimensions
2047.24,1850.39 to 2047.24,0 on Dimension
0,1850.39 to 2047.24,1850.39 on Dimension

## Text inside footprints (layer, text, board x,y; h text height)
J1: Top Overlay "1" at 1520.44,78.86 h31.5 r90
J4: Bottom Overlay "1" at 1287,1601 h30 r180
NTC1: Top Overlay "PCB Edge" at 1963,1833.37 h47.24 r180